# Altium PCB extension.PcbDoc (part 1 of 3)
Units mil, origin at the board's own origin, x right, y up, seen from the top; angles counter-clockwise.
Board outline 6141.73 x 4724.41 mil, 4 copper layers (Top Copper, Supply, GND, Bot Copper), stack 61.417 mil thick; 231 components, 147 nets, 660 pads, 234 vias.
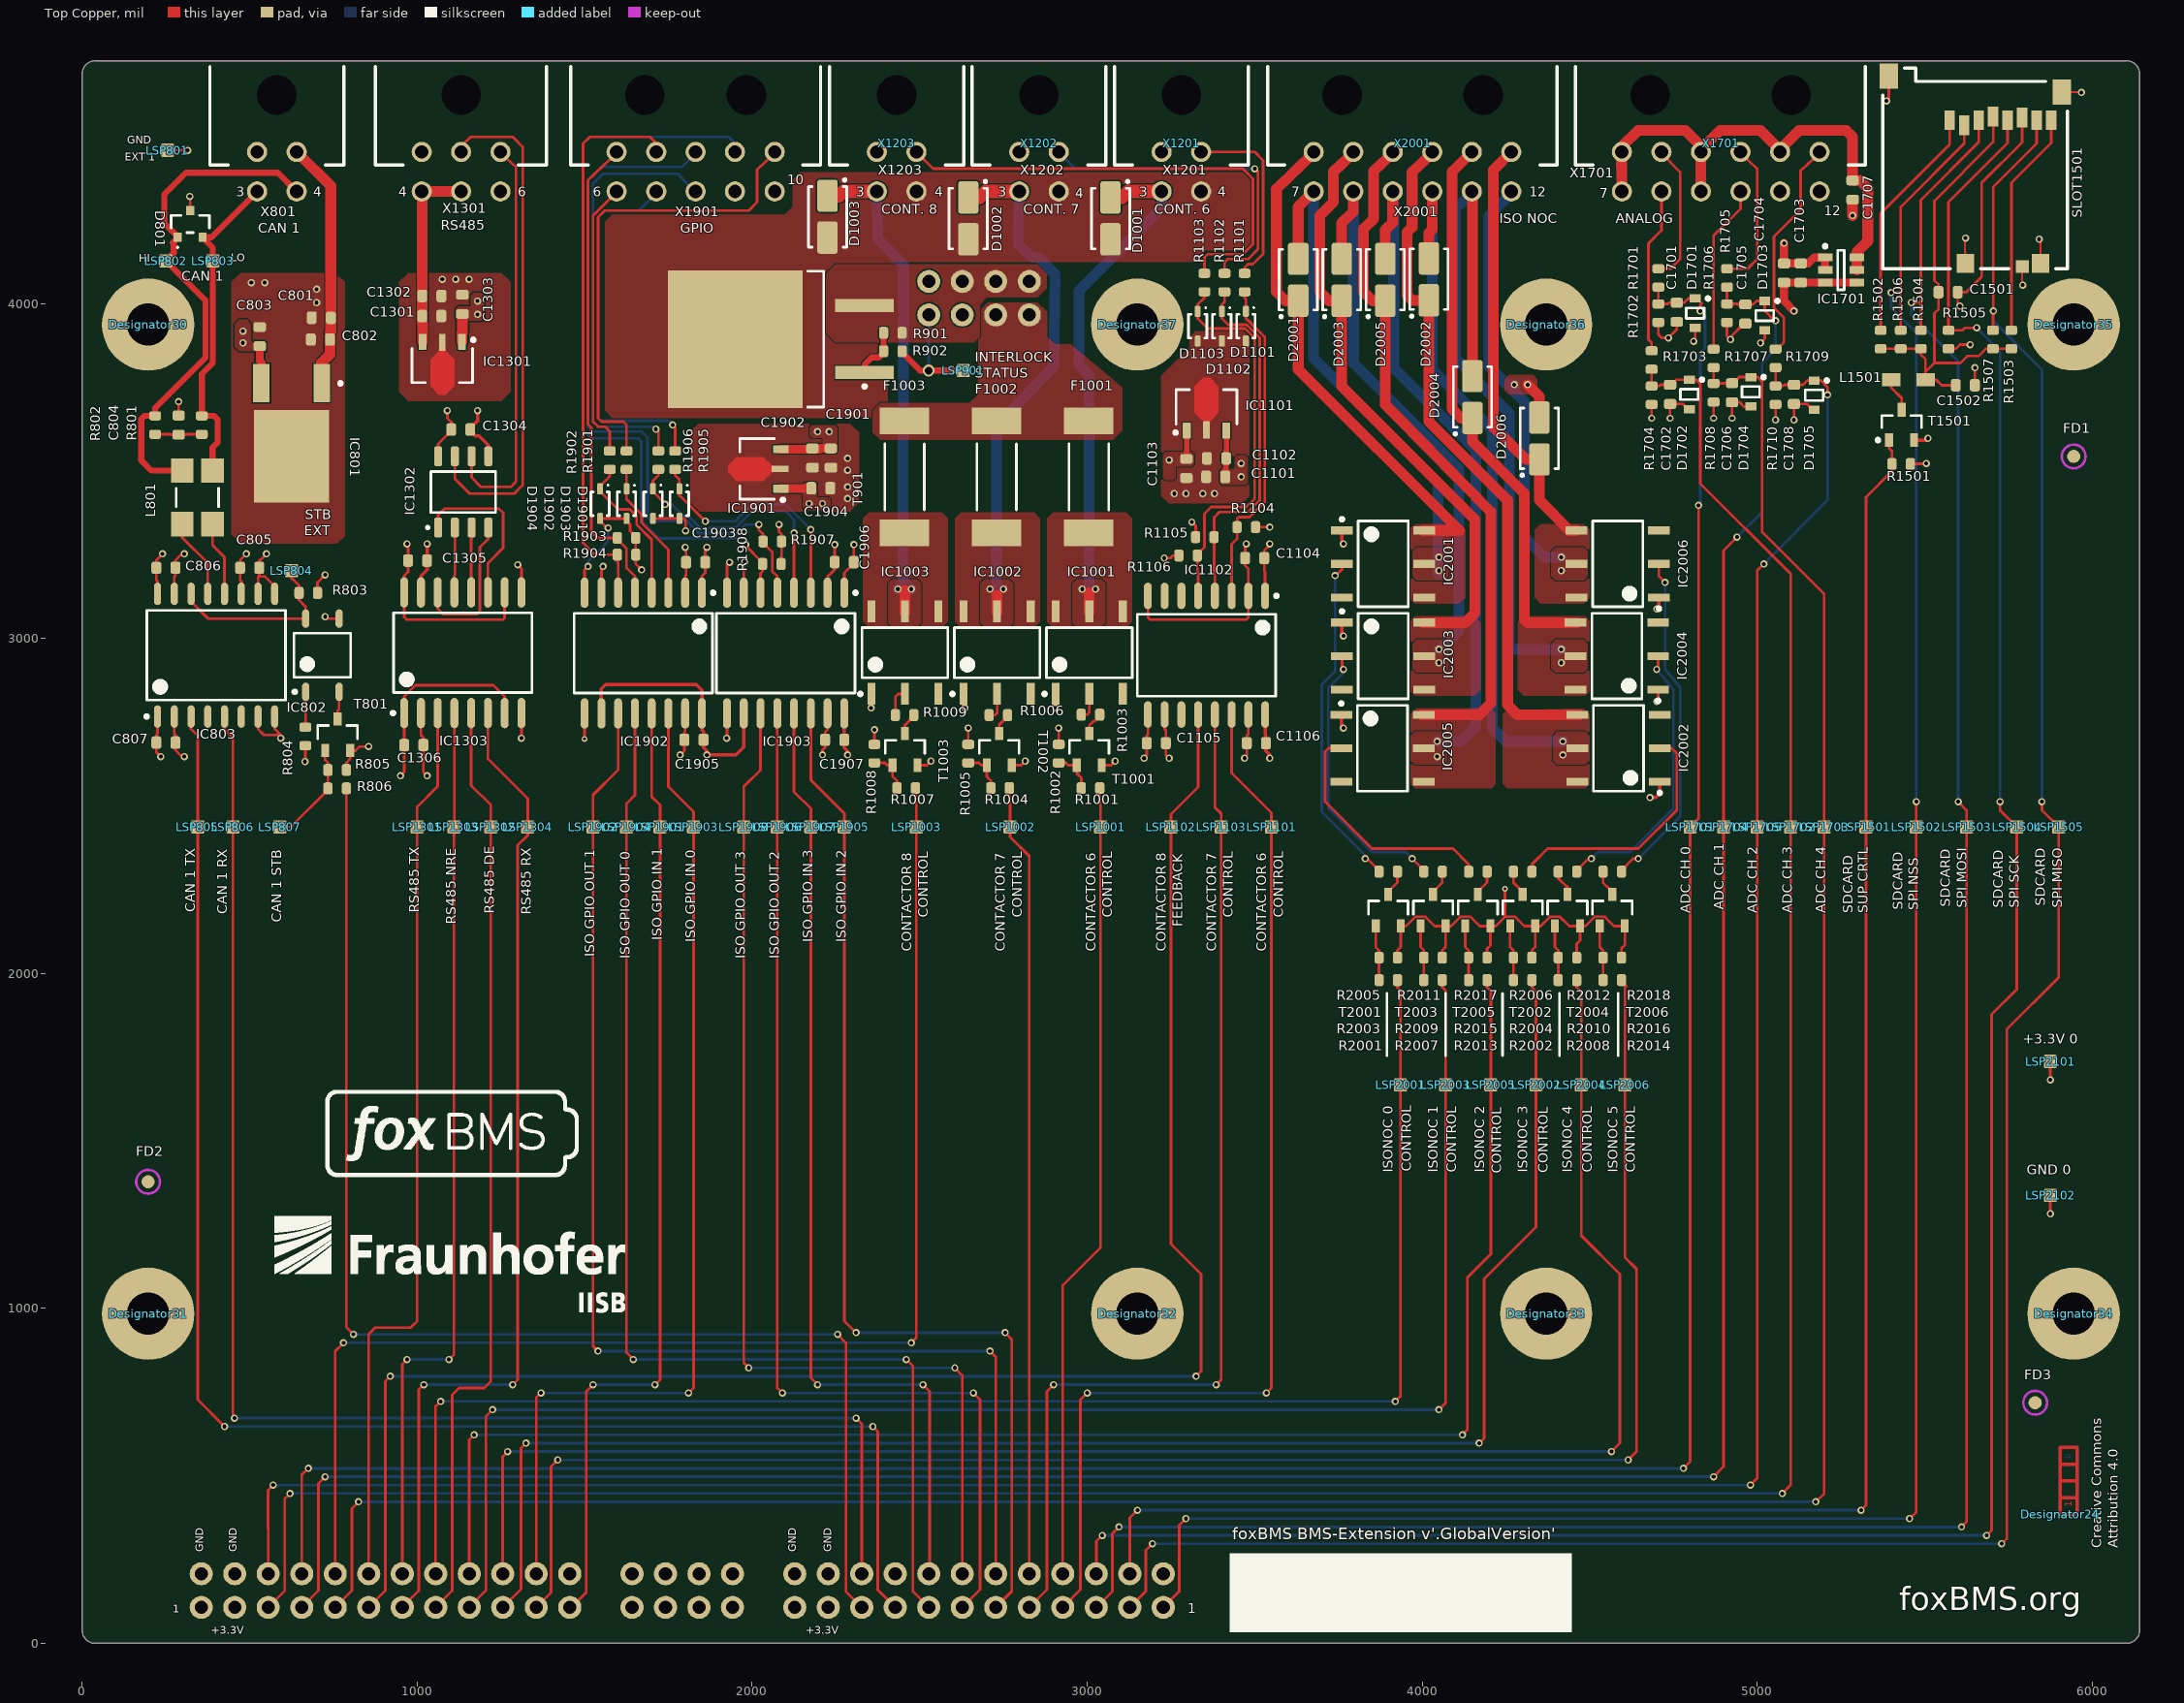
[diagram p0: Top Copper view]
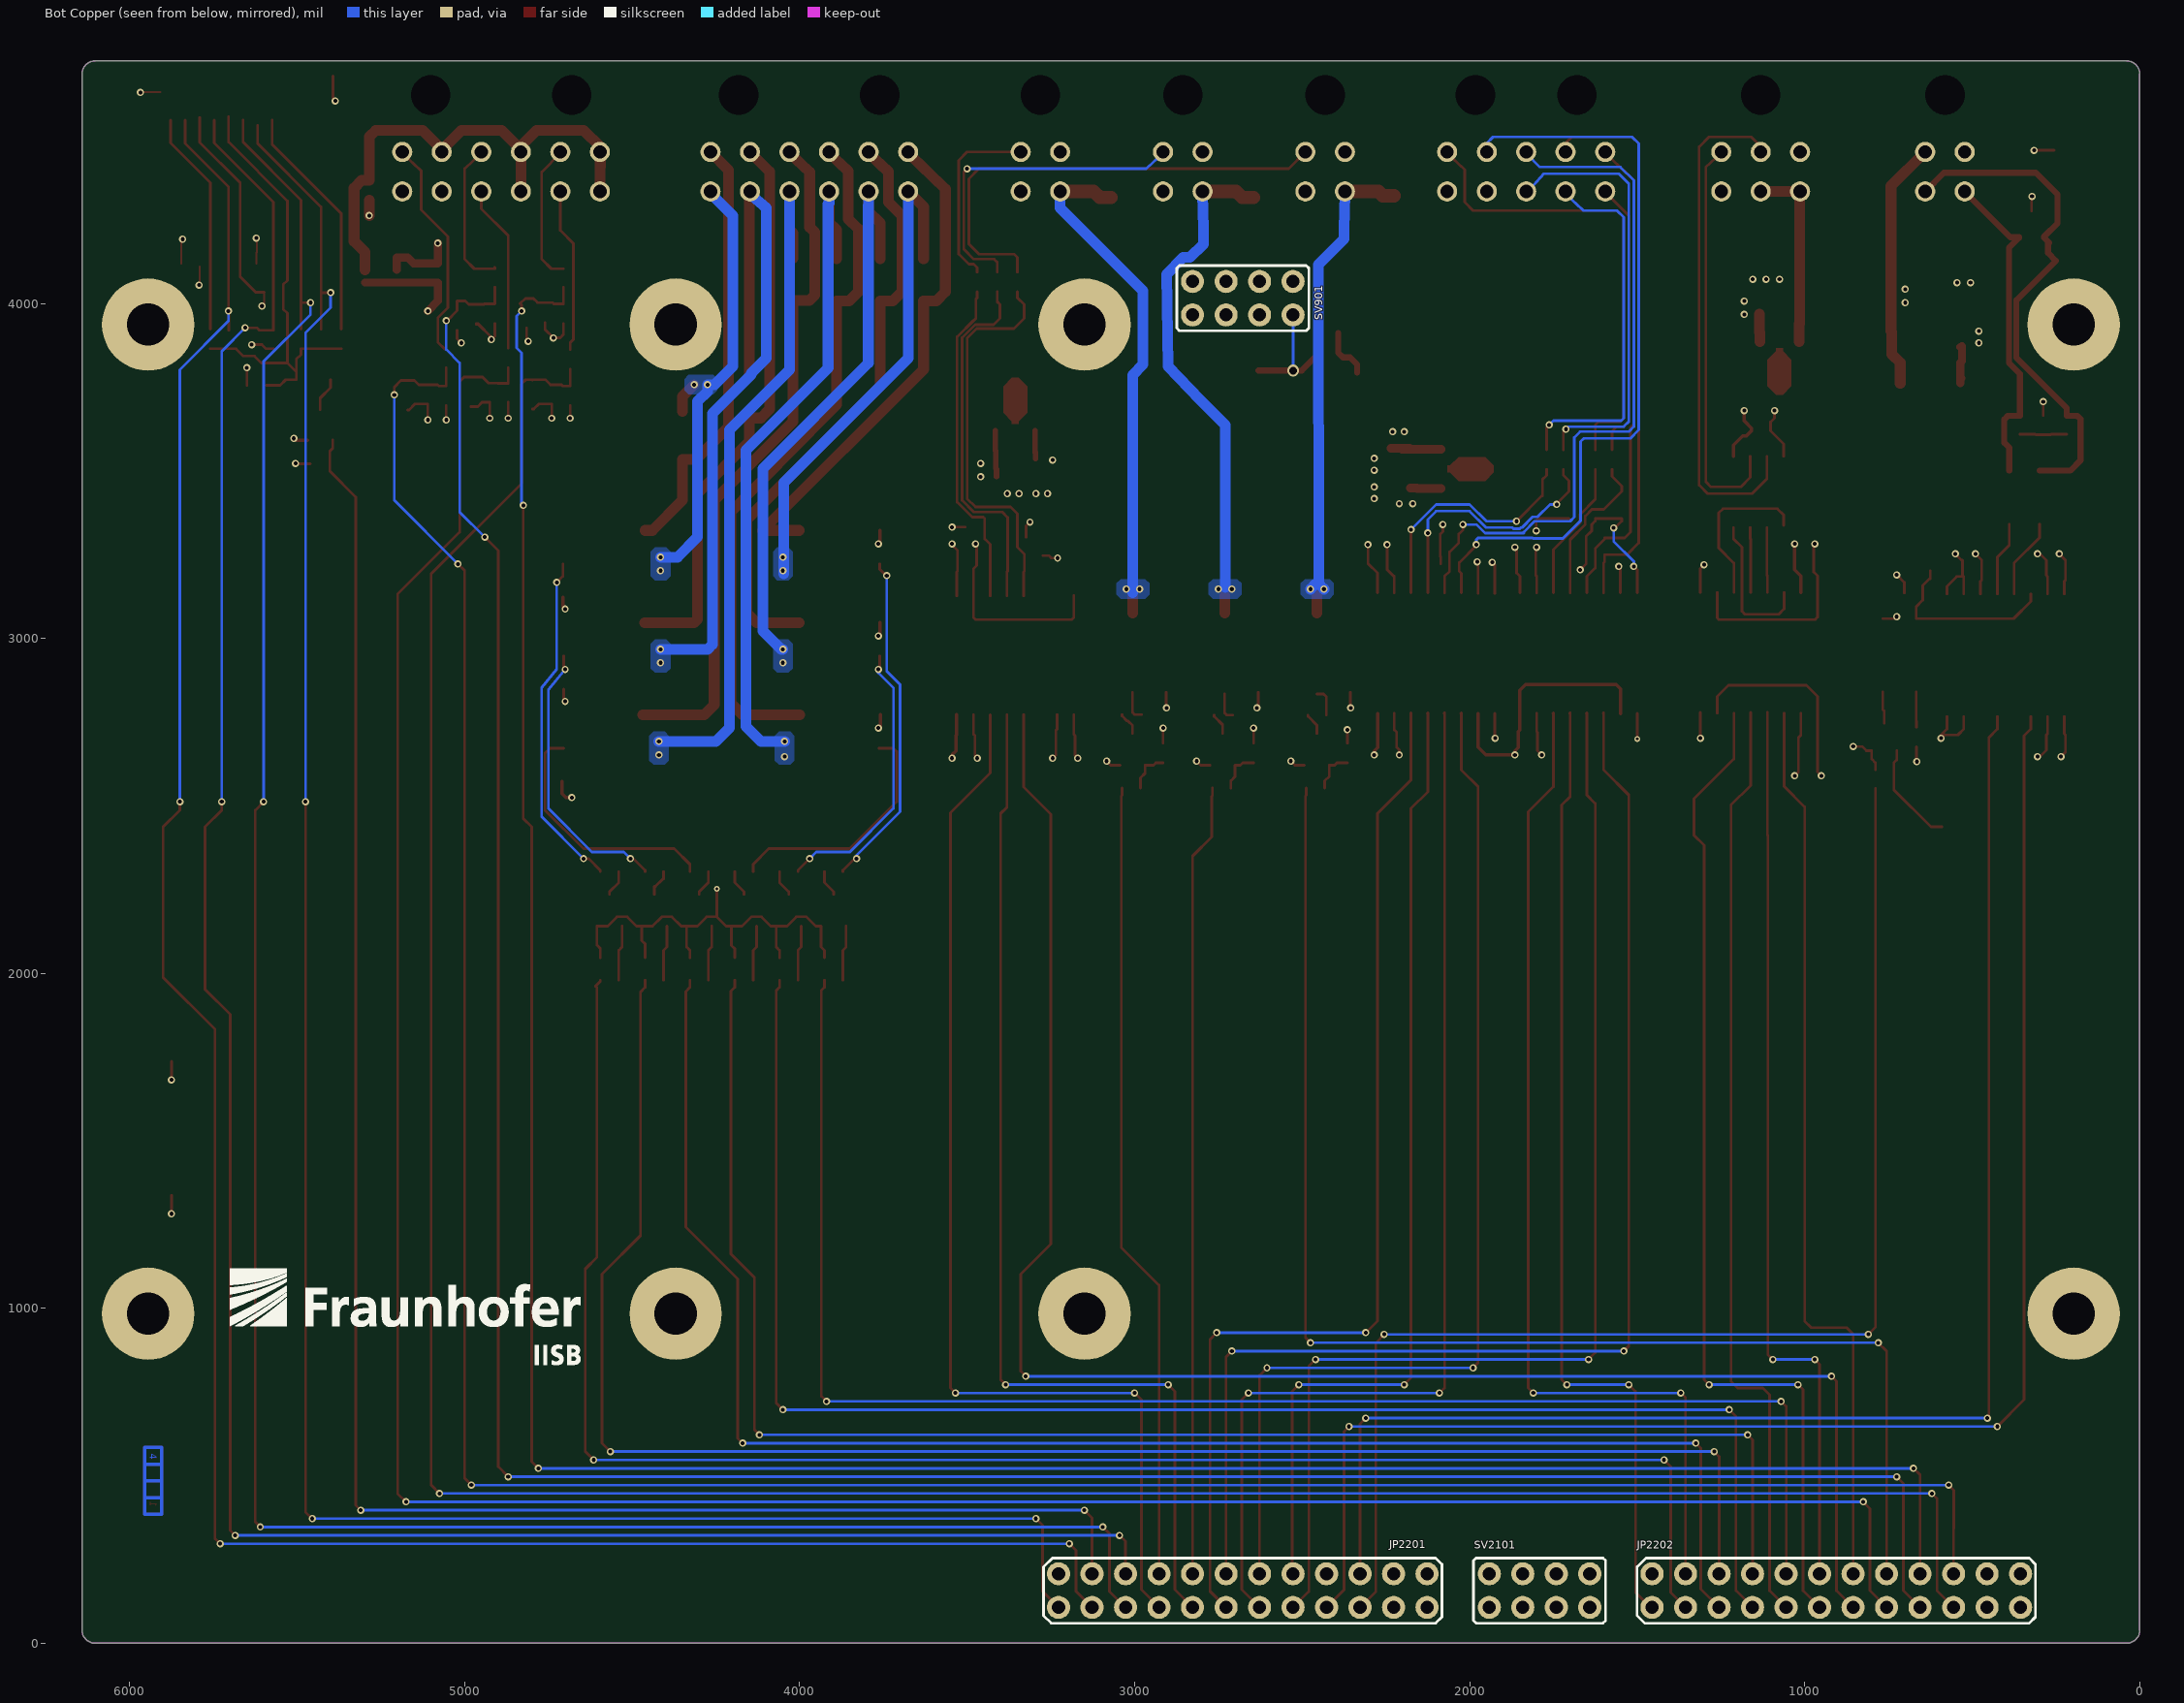
[diagram p1: Bot Copper view, seen from below]
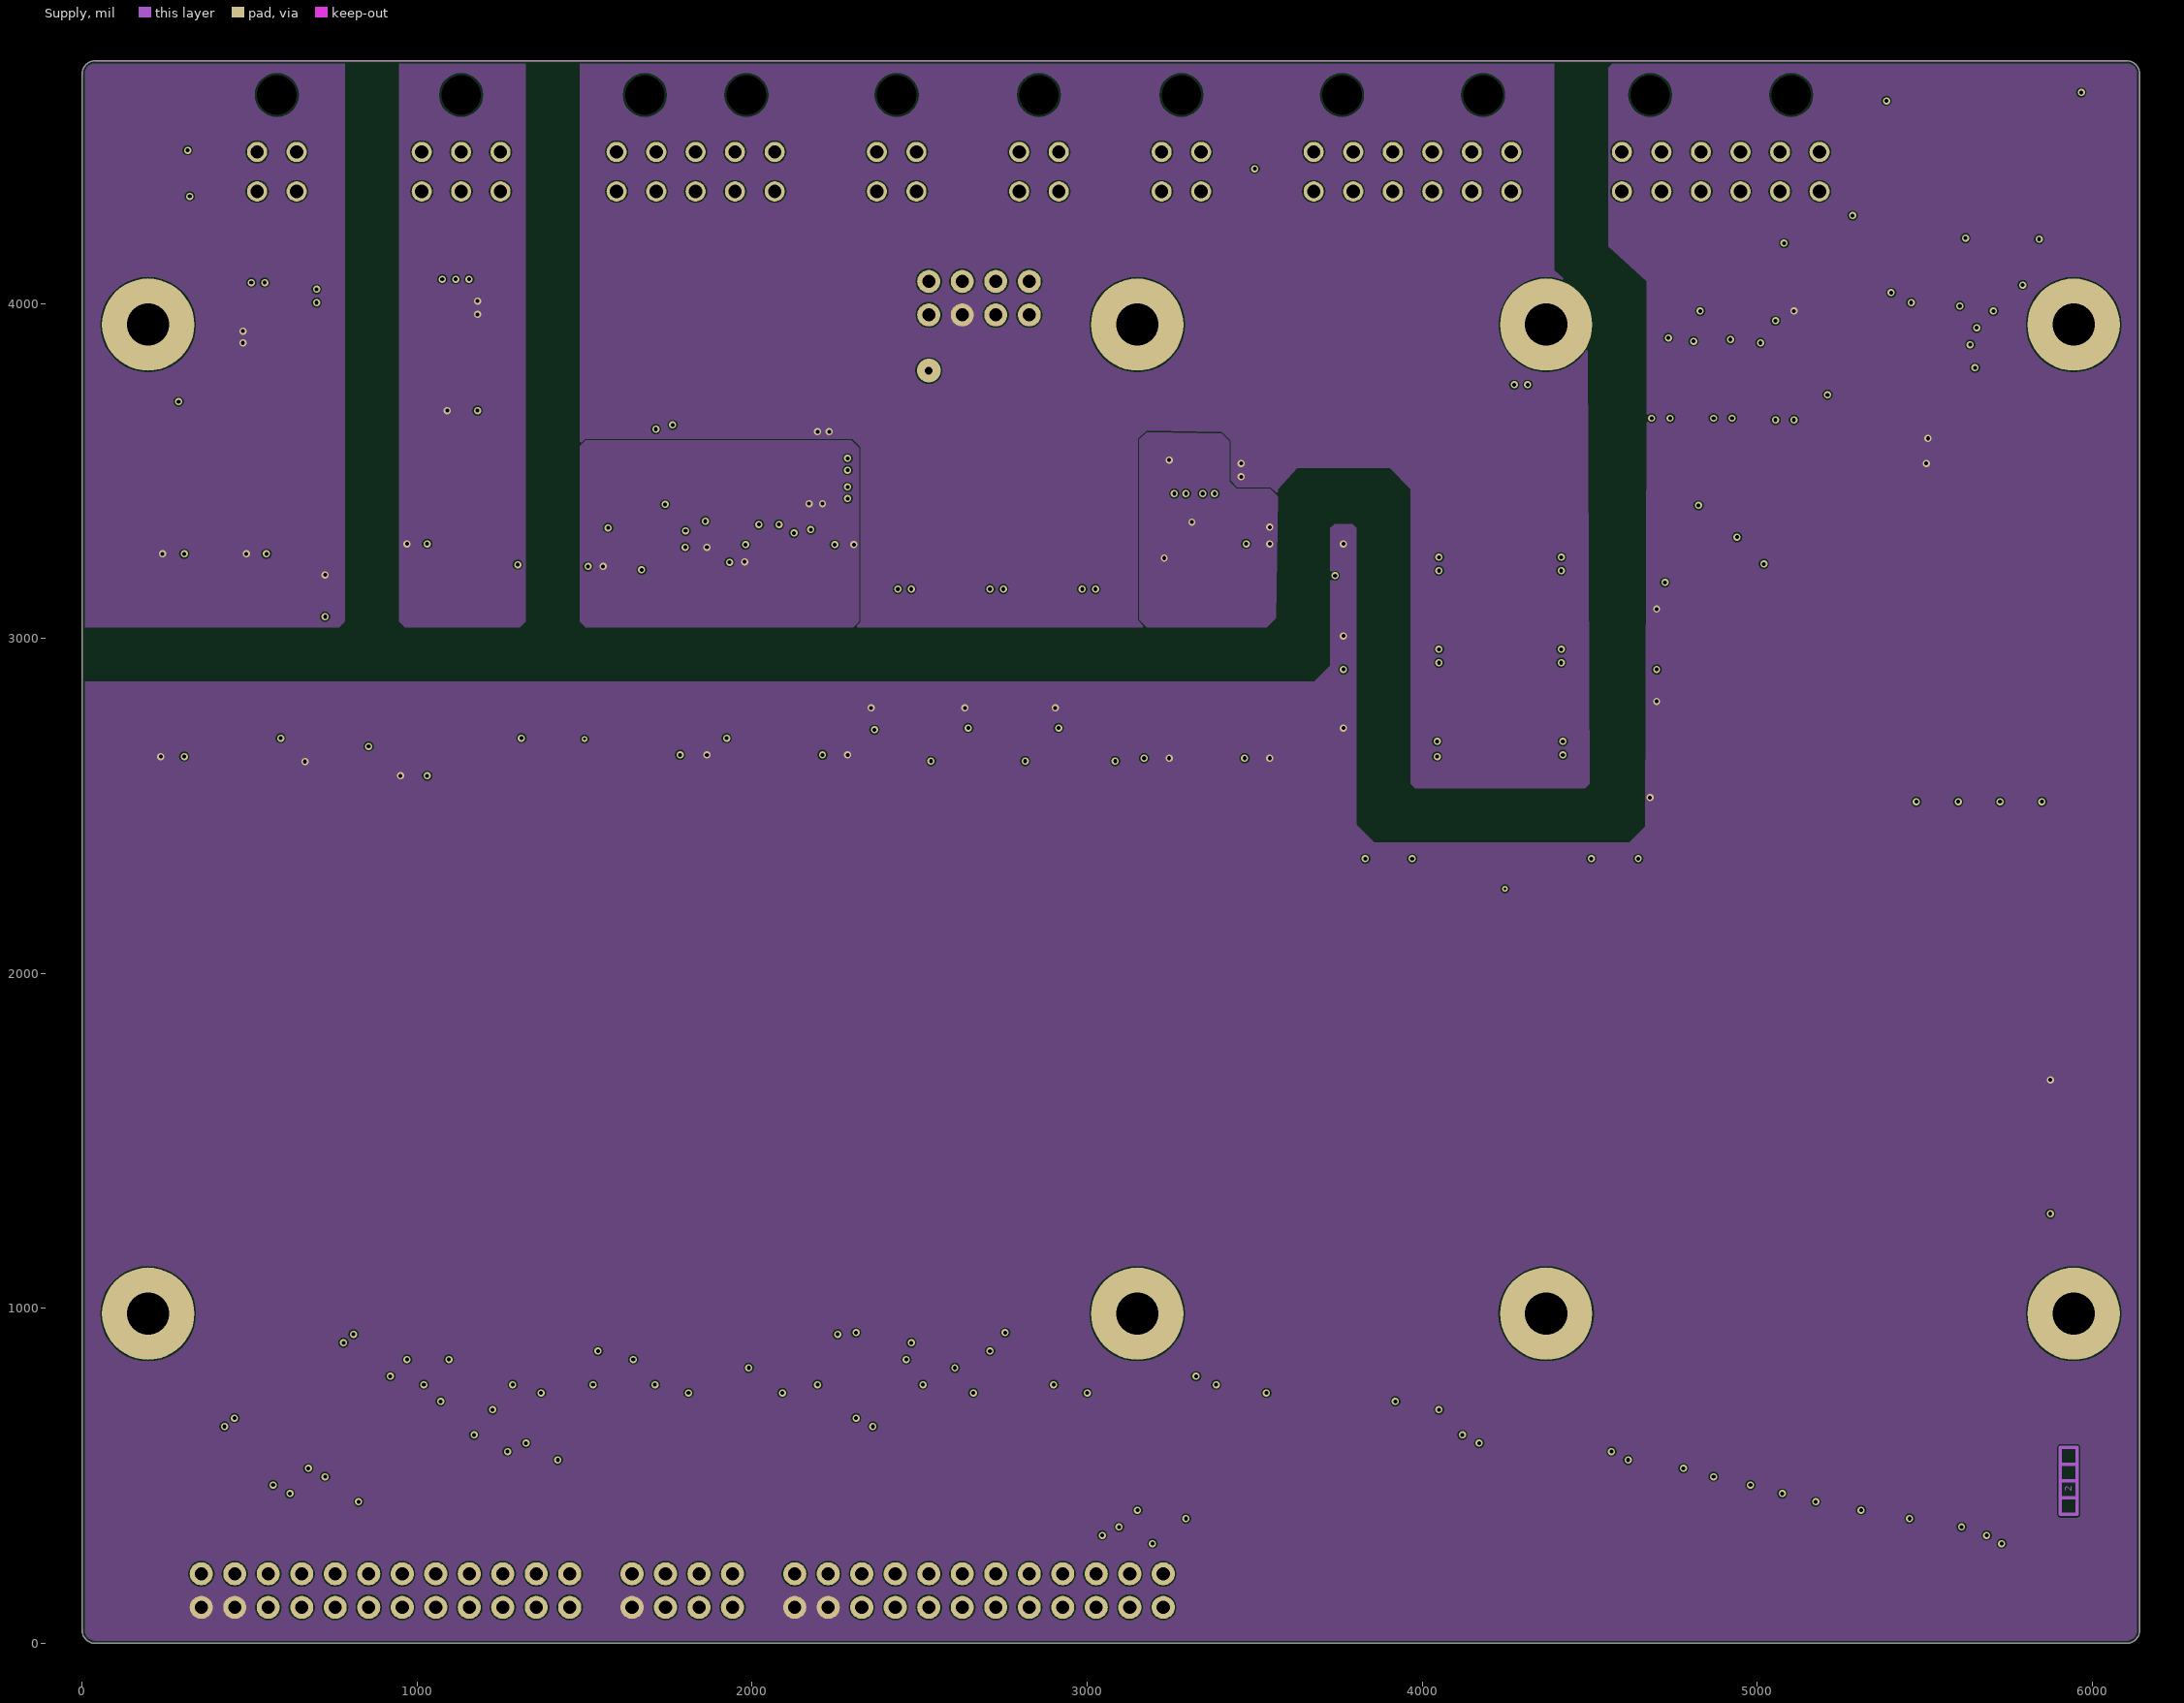
[diagram p2: Supply]
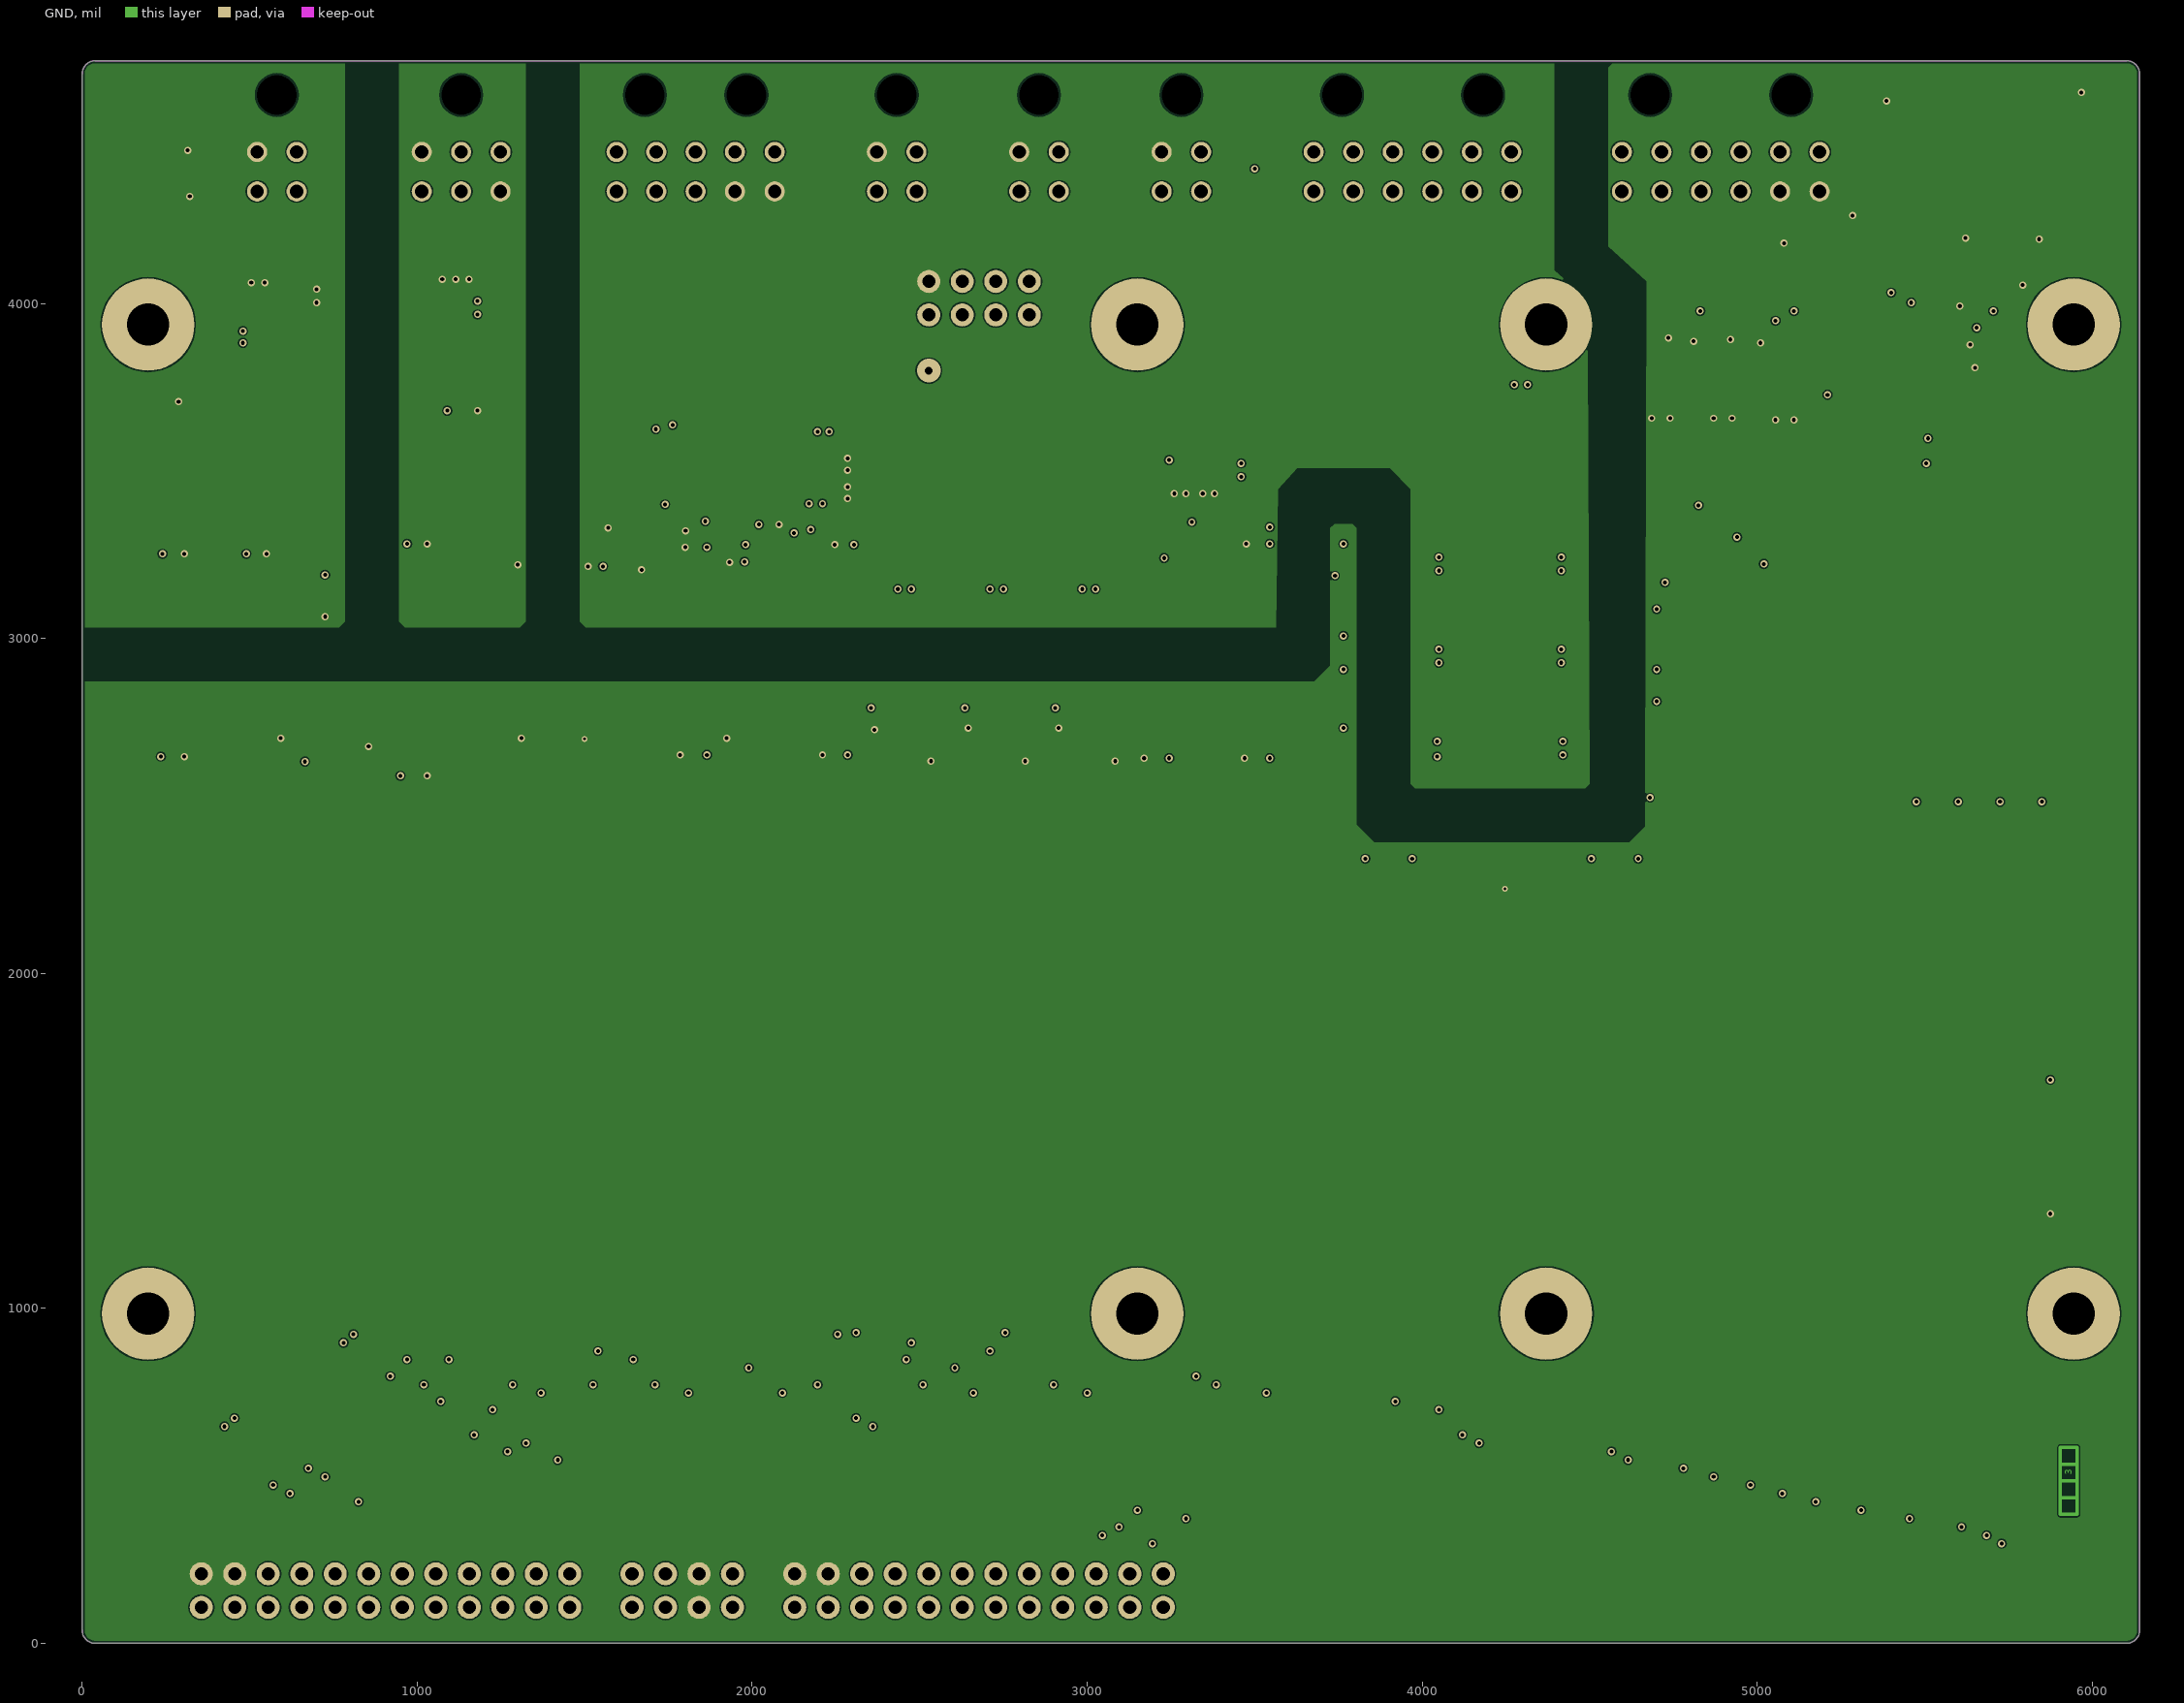
[diagram p3: GND]

## Layer stack, top to bottom
Top Solder: solder mask 0.591, Solder Resist, Dk 3.5
Top Copper: signal copper 1.378
Dielectric 1: prepreg 14.173, FR-4, Dk 4.6
Supply: signal copper 1.378
Dielectric 2: core 27.559, FR-4, Dk 4.6
GND: signal copper 1.378
Dielectric 3: prepreg 14.173, FR-4, Dk 4.6
Bot Copper: signal copper 1.378
Bottom Solder: solder mask 0.591, Solder Resist, Dk 3.5

## Board outline
0,39.37 0,4685.04 cw(c39.37,4685.04) 39.37,4724.41 6102.36,4724.41 cw(c6102.36,4685.04) 6141.73,4685.04 6141.73,39.37 cw(c6102.36,39.37) 6102.36,0 39.37,0 cw(c39.37,39.37)

## Design rules (kind name [scope] priority, off if disabled: settings)
AssemblyTestPointUsage [All] p1 off:
AssemblyTestpoint [(IsPad And (OnTopLayer Or OnBottomLayer)) Or (IsPad And OnMultiLayer)] p1 off: testpointundercomponent=FALSE minsize=40 maxsize=100 preferedsize=60 minholesize=0 maxholesize=40 preferedholesize=32 testpointgrid=1 usegrid=TRUE gridtolerance=0.01 allowsidetop=TRUE
BoardOutlineClearance [All] p1: gap=8 ignorepadtopadclearanceinfootprint=FALSE except(20: Arc-CavityEdge Track-CavityEdge SMDPad-CavityEdge THPad-CavityEdge Via-CavityEdge Fill-CavityEdge Poly-CavityEdge Region-CavityEdge Text-CavityEdge)
Clearance [All] p1: gap=4 ignorepadtopadclearanceinfootprint=TRUE except(6: Arc-Text Arc-Hole Track-Text Track-Hole SMDPad-Text SMDPad-Hole THPad-Text THPad-Hole Via-Text Via-Hole Fill-Text Fill-Hole Poly-Text Poly-Hole Region-Text Region-Hole Text-Text Text-Hole; 8: Arc-Via Track-Via SMDPad-Via THPad-Via Via-Via)
FabricationTestpoint [All] p1: side=1 testpointundercomponent=TRUE minsize=20 maxsize=300 preferedsize=60 minholesize=0 maxholesize=40 preferedholesize=32 testpointgrid=1 allowsidetop=TRUE usegrid=FALSE gridtolerance=0.01
HoleSize [All] p1: absolutevalues=TRUE maxlimit=236 minlimit=7.87 maxpercent=80.000 minpercent=20.000
HoleToHoleClearance [All] p1: gap=6 allowstackedmicrovias=TRUE
MinimumAnnularRing [All] p1: minimumring=4
MinimumSolderMaskSliver [All] p1: minsoldermaskwidth=4
PlaneConnect [All] p1: planeconnectstyle=Direct reliefexpansion=20 reliefentries=4 reliefconductorwidth=10 reliefairgap=10
PolygonConnect [All] p1: connectstyle=Direct reliefconductorwidth=10 reliefentries=4 polygonreliefangle="90 Angle" airgapwidth=10
RoutingVias [All] p1: holewidth=8 width=17.72 viastyle="Through Hole" minholewidth=8 minwidth=17.72 maxholewidth=39.37 maxwidth=275.59
SMDEntry [All] p1: side=TRUE corner=TRUE anyangle=FALSE
SMDToCorner [All] p1: distance=40000
SilkToSolderMaskClearance [IsPad] p1: minsilkscreentomaskgap=4 clearancetoexposedcopper=FALSE
SolderMaskExpansion SolderMaskExpansion_VIAs [IsVia] p1: expansion=-393.7 // Cover all Vias
SolderMaskExpansion [All] p2: expansion=2
UnRoutedNet [All] p1: checkbadconnections=TRUE
UnpouredPolygon UnpouredPolygon_1 [All] p1:
Width [All] p1: maxlimit=60 minlimit=4 preferedwidth=6
20 further rules are at their usual default settings.

## Classes and differential pairs
component class U_13_connectors_to_BMS_master: JP2201 JP2202
component class U_12_FPGA_SPI_interface: LSP2101 LSP2102 SV2101
component class U_11_isolated_NO_contacts: D2001 D2002 D2003 D2004 D2005 D2006 IC2001 IC2002 IC2003 IC2004 IC2005 IC2006 LSP2001 LSP2002 LSP2003 LSP2004 LSP2005 LSP2006 R2001 R2002 R2003 R2004 R2005 R2006 R2007 R2008 R2009 R2010 R2011 R2012 R2013 R2014 R2015 R2016 R2017 R2018 T2001 T2002 T2003 T2004 T2005 T2006 X2001
component class U_10_iso_GPIO_4in_4out: C1901 C1902 C1903 C1904 C1905 C1906 C1907 D1901 D1902 D1903 D1904 IC1901 IC1902 IC1903 LSP1901 LSP1902 LSP1903 LSP1904 LSP1905 LSP1906 LSP1907 LSP1908 R1901 R1902 R1903 R1904 R1905 R1906 R1907 R1908 X1901
component class U_09_analog_inputs_not_isolated: C1701 C1702 C1703 C1704 C1705 C1706 C1707 C1708 D1701 D1702 D1703 D1704 D1705 IC1701 LSP1701 LSP1702 LSP1703 LSP1704 LSP1705 R1701 R1702 R1703 R1704 R1705 R1706 R1707 R1708 R1709 R1710 X1701
component class U_08_memorycard: C1501 C1502 L1501 LSP1501 LSP1502 LSP1503 LSP1504 LSP1505 R1501 R1502 R1503 R1504 R1505 R1506 R1507 SLOT1501 T1501
component class U_07_isolated_rs485: C1301 C1302 C1303 C1304 C1305 C1306 IC1301 IC1302 IC1303 LSP1301 LSP1302 LSP1303 LSP1304 X1301
component class U_06_contactor_connectors: X1201 X1202 X1203
component class U_05_contactor_feedback: C1101 C1102 C1103 C1104 C1105 C1106 D1101 D1102 D1103 IC1101 IC1102 LSP1101 LSP1102 LSP1103 R1101 R1102 R1103 R1104 R1105 R1106
component class U_04_contactor_control: D1001 D1002 D1003 F1001 F1002 F1003 IC1001 IC1002 IC1003 LSP1001 LSP1002 LSP1003 R1001 R1002 R1003 R1004 R1005 R1006 R1007 R1008 R1009 T1001 T1002 T1003
component class U_03_interlock: LSP901 R901 R902 SV901 T901
component class U_02_CAN_1: C801 C802 C803 C804 C805 C806 C807 D801 IC801 IC802 IC803 L801 LSP801 LSP802 LSP803 LSP804 LSP805 LSP806 LSP807 R801 R802 R803 R804 R805 R806 T801 X801
polygon class PolygonThermal_OFF: Polygon_1_Net_+3.3V_0 Polygon_1_Net_CAN_TRANS_1_EXT_SUPPLY Polygon_1_Net_CONTACTOR_6_COIL_POS Polygon_1_Net_CONTACTOR_7_COIL_POS Polygon_1_Net_CONTACTOR_8_COIL_POS Polygon_1_Net_CONTACTOR_FEEDBACK_SUPPLY_EXT Polygon_1_Net_CONTACTORS_COMMON_NEG Polygon_1_Net_GND_0 Polygon_1_Net_GND_EXT_0 Polygon_1_Net_GND_EXT_1 Polygon_1_Net_GND_EXT_3 Polygon_1_Net_ISO_GPIO_SUPPLY Polygon_1_Net_ISONOC_0_NEGATIVE Polygon_1_Net_ISONOC_0_POSITIVE Polygon_1_Net_ISONOC_1_NEGATIVE Polygon_1_Net_ISONOC_1_POSITIVE Polygon_1_Net_ISONOC_2_NEGATIVE Polygon_1_Net_ISONOC_2_POSITIVE Polygon_1_Net_ISONOC_3_NEGATIVE Polygon_1_Net_ISONOC_3_POSITIVE Polygon_1_Net_ISONOC_4_NEGATIVE Polygon_1_Net_ISONOC_4_POSITIVE Polygon_1_Net_ISONOC_5_NEGATIVE Polygon_1_Net_ISONOC_5_POSITIVE Polygon_1_Net_N$18 Polygon_1_Net_N$19 Polygon_1_Net_N$21 Polygon_1_Net_N$279 Polygon_1_Net_SUPPLY_EXT_0 Polygon_1_Net_SUPPLY_EXT_2 Polygon_2_Net_CAN_TRANS_1_EXT_SUPPLY Polygon_2_Net_CONTACTOR_6_COIL_POS Polygon_2_Net_CONTACTOR_7_COIL_POS Polygon_2_Net_CONTACTOR_8_COIL_POS Polygon_2_Net_CONTACTOR_FEEDBACK_SUPPLY_EXT Polygon_2_Net_GND_EXT_0 Polygon_2_Net_GND_EXT_1 Polygon_2_Net_GND_EXT_3 Polygon_2_Net_ISO_GPIO_SUPPLY Polygon_2_Net_ISONOC_0_NEGATIVE Polygon_2_Net_ISONOC_1_NEGATIVE Polygon_2_Net_ISONOC_2_NEGATIVE Polygon_2_Net_ISONOC_3_NEGATIVE Polygon_2_Net_ISONOC_4_NEGATIVE Polygon_2_Net_ISONOC_5_NEGATIVE Polygon_2_Net_N$279 Polygon_2_Net_SUPPLY_EXT_0 Polygon_3_Net_GND_EXT_0 Polygon_3_Net_GND_EXT_2 Polygon_3_Net_ISONOC_0_NEGATIVE Polygon_3_Net_ISONOC_5_NEGATIVE Polygon_3_Net_N$279 Polygon_3_Net_SUPPLY_EXT_0 Polygon_4_Net_ISONOC_5_NEGATIVE
polygon class Isolate_8: Polygon_1_Net_CONTACTOR_6_COIL_POS Polygon_1_Net_CONTACTOR_7_COIL_POS Polygon_1_Net_CONTACTOR_8_COIL_POS Polygon_1_Net_CONTACTOR_FEEDBACK_SUPPLY_EXT Polygon_1_Net_CONTACTORS_COMMON_NEG Polygon_1_Net_ISO_GPIO_SUPPLY Polygon_1_Net_ISONOC_0_NEGATIVE Polygon_1_Net_ISONOC_0_POSITIVE Polygon_1_Net_ISONOC_1_NEGATIVE Polygon_1_Net_ISONOC_1_POSITIVE Polygon_1_Net_ISONOC_2_NEGATIVE Polygon_1_Net_ISONOC_2_POSITIVE Polygon_1_Net_ISONOC_3_NEGATIVE Polygon_1_Net_ISONOC_3_POSITIVE Polygon_1_Net_ISONOC_4_NEGATIVE Polygon_1_Net_ISONOC_4_POSITIVE Polygon_1_Net_ISONOC_5_NEGATIVE Polygon_1_Net_ISONOC_5_POSITIVE Polygon_1_Net_N$18 Polygon_1_Net_N$19 Polygon_1_Net_N$21 Polygon_1_Net_SUPPLY_EXT_0 Polygon_2_Net_CAN_TRANS_1_EXT_SUPPLY Polygon_2_Net_GND_EXT_0 Polygon_2_Net_GND_EXT_1 Polygon_2_Net_GND_EXT_3 Polygon_2_Net_N$279 Polygon_3_Net_GND_EXT_0 Polygon_3_Net_GND_EXT_2 Polygon_3_Net_N$279 Polygon_3_Net_SUPPLY_EXT_0
polygon class Isolate_10: Polygon_2_Net_SUPPLY_EXT_0
pad class SMDSolder_OFF: IC1101-2 IC1301-2 IC1901-2 T901-2
pad class SMDPaste_OFF: IC1101-2 IC1301-2 IC1901-2 T901-1 T901-2 T901-3

## Components (designator, comment, footprint, x,y, rotation, side; value= is the part's Value field where it differs from the comment)
C801 "1u/50V" CAPC1608X08N 713.74,3957.4 r0 top locked
C802 "100n/50V" CAPC1608X08N 711.26,3892.4 r0 top
C803 "100n/50V" CAPC1608X08N 530,3901.14 r270 top
C804 "4n7/50V" CAPC1608X08N 288,3637 r90 top
C805 "100n/50V" CAPC1608X08N 500,3210.99 r180 top
C806 "100n/50V" CAPC1608X08N 250,3210.99 r180 top
C807 "100n/50V" CAPC1608X08N 250,2689.01 r180 top
C1101 "100n/50V" CAPC1608X08N 3383.74,3482.4 r180 top
C1102 "1u/50V" CAPC1608X08N 3386.26,3537.4 r180 top
C1103 "100n/50V" CAPC1608X08N 3296.26,3507.4 r270 top
C1104 "100n/50V" CAPC1608X08N 3500,3240 r180 top
C1105 "100n/50V" CAPC1608X08N 3206.26,2687.4 r180 top
C1106 "100n/50V" CAPC1608X08N 3505,2687.4 r180 top
C1301 "1u/50V" CAPC1608X08N 1043.74,3962.4 r0 top
C1302 "100n/50V" CAPC1608X08N 1043.74,4022.4 r0 top
C1303 "100n/50V" CAPC1608X08N 1135,3997.4 r90 top
C1304 "100n/50V" CAPC1608X08N 1130,3623.59 r0 top
C1305 "100n/50V" CAPC1608X08N 1001.26,3232.4 r0 top
C1306 "100n/50V" CAPC1608X08N 990,2681.64 r0 top
C1501 "100n/50V" CAPC1608X08N 5570,4033.66 r180 top
C1502 "1u/50V" CAPC1608X08N 5621.46,3756 r0 top locked
C1701 "100n/50V" CAPC1608X08N 4760,3973.66 r270 top
C1702 "100n/50V" CAPC1608X08N 4740,3728.66 r270 top
C1703 "1u/50V" CAPC1608X08N 5130,4091.14 r90 top
C1704 "100n/50V" CAPC1608X08N 5080,4091.14 r90 top
C1705 "100n/50V" CAPC1608X08N 4965,3968.66 r270 top
C1706 "100n/50V" CAPC1608X08N 4925,3733.66 r270 top
C1707 "100n/50V" CAPC1608X08N 5285,4338.66 r270 top
C1708 "100n/50V" CAPC1608X08N 5110,3728.66 r270 top
C1901 "100n/50V" CAPC1608X08N 2235,3538.66 r270 top
C1902 "1u/50V" CAPC1608X08N 2180,3538.66 r270 top
C1903 "100n/50V" CAPC1608X08N 1831.26,3227.4 r180 top
C1904 "100n/50V" CAPC1608X08N 2205,3448.66 r0 top
C1905 "100n/50V" CAPC1608X08N 1826.26,2697.4 r180 top
C1906 "100n/50V" CAPC1608X08N 2275,3228 r180 top locked
C1907 "100n/50V" CAPC1608X08N 2246.26,2697.4 r180 top
D801 "PESD1CAN" NXP-SOT23-3_V 322.5,4237.4 r180 top
D1001 "d_si_sma_1A" DIOM4326X24N 3070,4253.66 r270 top locked
D1002 "d_si_sma_1A" DIOM4326X24N 2645,4253.66 r270 top locked
D1003 "d_si_sma_1A" DIOM4326X24N 2225,4258.66 r270 top locked
D1101 "CDSOD323-T05" SODFL250X110-2N 3473.82,3932.31 r270 top
D1102 "CDSOD323-T05" SODFL250X110-2N 3401.91,3932.31 r270 top
D1103 "CDSOD323-T05" SODFL250X110-2N 3330,3932 r270 top
D1701 "MM3Z3V3ST1G" ONSC-SOD-323-2-477-02_V 4815,3971.14 r270 top
D1702 "MM3Z3V3ST1G" ONSC-SOD-323-2-477-02_V 4797.5,3728.64 r270 top
D1703 "MM3Z3V3ST1G" ONSC-SOD-323-2-477-02_V 5022.5,3963.64 r270 top
D1704 "MM3Z3V3ST1G" ONSC-SOD-323-2-477-02_V 4981.25,3736.14 r270 top
D1705 "MM3Z3V3ST1G" ONSC-SOD-323-2-477-02_V 5170,3726.14 r270 top
D1901 "CDSOD323-T05" SODFL250X110-2N 1625,3402.31 r270 top
D1902 "CDSOD323-T05" SODFL250X110-2N 1546.09,3402.31 r270 top
D1903 "CDSOD323-T05" SODFL250X110-2N 1782.82,3402.31 r270 top
D1904 "CDSOD323-T05" SODFL250X110-2N 1703.91,3402.31 r270 top
D2001 "d_si_sma_1A" DIOM4326X24N 3630,4071.14 r90 top locked
D2002 "d_si_sma_1A" DIOM4326X24N 4020,4072.4 r90 top locked
D2003 "d_si_sma_1A" DIOM4326X24N 3760,4071.14 r90 top locked
D2004 "d_si_sma_1A" DIOM4326X24N 4150,3721.14 r90 top locked
D2005 "d_si_sma_1A" DIOM4326X24N 3890,4071.14 r90 top locked
D2006 "d_si_sma_1A" DIOM4326X24N 4350,3597.4 r90 top locked
Designator24 "Comment" layermarker4 5905,385 r90 top
Designator30 "Comment" Hole_3.2_Iso 196.85,3937.01 r0 top
Designator31 "Comment" Hole_3.2_Iso 196.85,984.25 r0 top
Designator32 "Comment" Hole_3.2_Iso 3149.61,984.25 r0 top
Designator33 "Comment" Hole_3.2_Iso 4370.08,984.25 r0 top
Designator34 "Comment" Hole_3.2_Iso 5944.88,984.25 r0 top
Designator35 "Comment" Hole_3.2_Iso 5944.88,3937.01 r0 top
Designator36 "Comment" Hole_3.2_Iso 4370.08,3937.01 r0 top
Designator37 "Comment" Hole_3.2_Iso 3149.61,3937.01 r0 top
F1001 "Schurter SMD Fuse 4.0A UMT 3403.0172.11" Schurter_UMT_250 3005,3482.4 r90 top locked
F1002 "Schurter SMD Fuse 4.0A UMT 3403.0172.11" Schurter_UMT_250 2730,3482.4 r90 top locked
F1003 "Schurter SMD Fuse 4.0A UMT 3403.0172.11" Schurter_UMT_250 2455,3482.4 r90 top locked
FD1 "Fiducial" Fiducial_2 5944.88,3543.31 r0 top locked
FD2 "Fiducial" Fiducial_2 196.85,1377.95 r0 top locked
FD3 "Fiducial" Fiducial_2 5829.88,718.31 r0 top locked (schematic designator FD1)
IC801 "KA7805ERT" DPAK228P950X240-3N 625,3612.4 r270 top
IC802 "CPC1008N" SOP254P610X218-4N 717.1,2949.9 r90 top
IC803 "TJA1052IT/5Y" NXP-SOIC-16_L 400,2950 r90 top
IC1001 "AQV252G2SX" SOP254P680X220-6N 3006.26,2957.4 r90 top
IC1002 "AQV252G2SX" SOP254P680X220-6N 2731.26,2957.4 r90 top
IC1003 "AQV252G2SX" SOP254P680X220-6N 2456.26,2957.4 r90 top
IC1101 "UA78L05CPK" PK0003A_L 3356.25,3687.4 r90 top
IC1102 "ADUM3300CRWZ" ADI-RW-16_L 3356.25,2949.9 r270 top locked
IC1301 "UA78L05CPK" PK0003A_L 1075,3818.65 r270 top locked
IC1302 "LT1785" SOIC127P600X175-8N 1137.5,3437.4 r90 top locked
IC1303 "ADUM3401CRWZ" ADI-RW-16_N 1136.25,2957.4 r90 top locked
IC1701 "ADR3425ARJZ-R2" ADI-RJ-6_N 5250.25,4100 r0 top locked
IC1901 "UA78L05CPK" PK0003A_L 2018.75,3506.15 r180 top locked
IC1902 "ADUM3402BRWZ" ADI-RW-16_N 1675,2956.15 r270 top
IC1903 "ADUM3402BRWZ" ADI-RW-16_N 2100,2956.15 r270 top
IC2001 "AQV252G2SX" SOP254P680X220-6N 3883.74,3222.4 r0 top
IC2002 "AQV252G2SX" SOP254P680X220-6N 4586.26,2672.4 r180 top
IC2003 "AQV252G2SX" SOP254P680X220-6N 3883.74,2947.4 r0 top
IC2004 "AQV252G2SX" SOP254P680X220-6N 4581.26,2947.4 r180 top
IC2005 "AQV252G2SX" SOP254P680X220-6N 3881.26,2672.4 r0 top
IC2006 "AQV252G2SX" SOP254P680X220-6N 4583.74,3222.4 r180 top
JP2201 "X2x12" Pinheader_2.54_2x12 2677.17,157.48 r180 bottom locked
JP2202 "X2x12" Pinheader_2.54_2x12 905.51,157.48 r180 bottom locked
L801 "51uH" B82789C0/S0 344,3421 r270 top
L1501 "BLM21AG471SN1J" MURA-BLM21-H1-CHIP-2_V 5451.26,3772.4 r180 top
LSP801 "Testpoint_Square" Testpoint_S1 255,4457.4 r90 top
LSP802 "Testpoint_Square" Testpoint_S1 250,4127.4 r0 top
LSP803 "Testpoint_Square" Testpoint_S1 390,4127.4 r0 top
LSP804 "Testpoint_Square" Testpoint_S1 625,3202.17 r90 top
LSP805 "Testpoint_Square" Testpoint_S1 345,2437.4 r90 top locked
LSP806 "Testpoint_Square" Testpoint_S1 450,2437.4 r90 top locked
LSP807 "Testpoint_Square" Testpoint_S1 590,2437.4 r90 top
LSP901 "Testpoint_Square" Testpoint_S1 2630,3800 r0 top
LSP1001 "Testpoint_Square" Testpoint_S1 3040,2437.4 r270 top
LSP1002 "Testpoint_Square" Testpoint_S1 2770,2437.4 r270 top
LSP1003 "Testpoint_Square" Testpoint_S1 2490,2437.4 r270 top
LSP1101 "Testpoint_Square" Testpoint_S1 3550,2437.4 r90 top
LSP1102 "Testpoint_Square" Testpoint_S1 3250,2437.4 r90 top
LSP1103 "Testpoint_Square" Testpoint_S1 3400,2437.4 r90 top
LSP1301 "Testpoint_Square" Testpoint_S1 1000,2437.4 r90 top locked
LSP1302 "Testpoint_Square" Testpoint_S1 1220,2437.4 r90 top locked
LSP1303 "Testpoint_Square" Testpoint_S1 1110,2437.4 r90 top locked
LSP1304 "Testpoint_Square" Testpoint_S1 1330,2437.4 r90 top locked
LSP1501 "Testpoint_Square" Testpoint_S1 5325,2437.4 r270 top
LSP1502 "Testpoint_Square" Testpoint_S1 5475,2437.4 r270 top
LSP1503 "Testpoint_Square" Testpoint_S1 5625,2437.4 r270 top
LSP1504 "Testpoint_Square" Testpoint_S1 5775,2437.4 r270 top
LSP1505 "Testpoint_Square" Testpoint_S1 5900,2437.4 r270 top
LSP1701 "Testpoint_Square" Testpoint_S1 4800,2437.4 r90 top
LSP1702 "Testpoint_Square" Testpoint_S1 5100,2437.4 r90 top
LSP1703 "Testpoint_Square" Testpoint_S1 5200,2437.4 r90 top
LSP1704 "Testpoint_Square" Testpoint_S1 4900,2437.4 r90 top
LSP1705 "Testpoint_Square" Testpoint_S1 5000,2437.4 r90 top
LSP1901 "Testpoint_Square" Testpoint_S1 1725,2437.4 r270 top locked
LSP1902 "Testpoint_Square" Testpoint_S1 1525,2437.4 r270 top locked
LSP1903 "Testpoint_Square" Testpoint_S1 1825,2437.4 r270 top locked
LSP1904 "Testpoint_Square" Testpoint_S1 1625,2437.4 r270 top locked
LSP1905 "Testpoint_Square" Testpoint_S1 2275,2437.4 r270 top locked
LSP1906 "Testpoint_Square" Testpoint_S1 2075,2437.4 r270 top locked
LSP1907 "Testpoint_Square" Testpoint_S1 2175,2437.4 r270 top locked
LSP1908 "Testpoint_Square" Testpoint_S1 1975,2437.4 r270 top locked
LSP2001 "Testpoint_Square" Testpoint_S1 3935,1667.4 r90 top
LSP2002 "Testpoint_Square" Testpoint_S1 4340,1667.4 r90 top
LSP2003 "Testpoint_Square" Testpoint_S1 4070,1667.4 r90 top
LSP2004 "Testpoint_Square" Testpoint_S1 4475,1667.4 r90 top
LSP2005 "Testpoint_Square" Testpoint_S1 4205,1667.4 r90 top
LSP2006 "Testpoint_Square" Testpoint_S1 4605,1667.4 r90 top
LSP2101 "Testpoint_Square" Testpoint_S1 5875,1737.4 r0 top
LSP2102 "Testpoint_Square" Testpoint_S1 5875,1337.4 r0 top
R801 "62R" RESC1608X05N 357.07,3637 r270 top
R802 "62R" RESC1608X05N 218,3637 r90 top
R803 "10k" RESC1608X05N 675,3136.09 r180 top locked
R804 "430R" RESC1608X05N 666.26,2707.4 r90 top locked
R805 "10k" RESC1608X05N 761.26,2607.4 r0 top
R806 "10R" RESC1608X05N 761.26,2552.4 r0 top locked
R901 "10k" RESC1608X05N 2420,3912.4 r0 top
R902 "10R" RESC1608X05N 2420,3857.4 r0 top locked
R1001 "10R" RESC1608X05N 3010,2553.33 r0 top locked
R1002 "10k" RESC1608X05N 2915,2656.14 r270 top
R1003 "430R" RESC1608X05N 3010,2772.4 r180 top locked
R1004 "10R" RESC1608X05N 2740,2553.33 r0 top locked
R1005 "10k" RESC1608X05N 2645,2656.14 r270 top
R1006 "430R" RESC1608X05N 2735,2771.14 r180 top locked
R1007 "10R" RESC1608X05N 2460,2553.33 r0 top locked
R1008 "10k" RESC1608X05N 2365,2656.14 r270 top
R1009 "430R" RESC1608X05N 2455,2771.14 r180 top locked
R1101 "47R" RESC1608X05N 3470,4062.4 r90 top locked
R1102 "47R" RESC1608X05N 3410,4062.4 r90 top locked
R1103 "47R" RESC1608X05N 3350,4062.4 r90 top locked
R1104 "10k" RESC1608X05N 3475,3332.4 r0 top
R1105 "10k" RESC1608X05N 3351.26,3302.4 r180 top
R1106 "10k" RESC1608X05N 3301.26,3247.4 r180 top
R1501 "47k" RESC1608X05N 5430,3521.14 r0 top
R1502 "10k" RESC1608X05N 5368.74,3892.4 r270 top
R1503 "10k" RESC1608X05N 5758.74,3892.4 r270 top
R1504 "10k" RESC1608X05N 5488.74,3892.4 r270 top
R1505 "10k" RESC1608X05N 5571.26,3892.4 r90 top
R1506 "10k" RESC1608X05N 5428.74,3892.4 r270 top
R1507 "10k" RESC1608X05N 5703.74,3892.4 r270 top
R1701 "0R" RESC1608X05N 4705,4076.14 r270 top locked
R1702 "4k75" RESC1608X05N 4705,3971.14 r270 top locked
R1703 "0R" RESC1608X05N 4685,3831.14 r270 top locked
R1704 "4k75" RESC1608X05N 4685,3726.14 r270 top locked
R1705 "0R" RESC1608X05N 4910,4076.14 r270 top locked
R1706 "4k75" RESC1608X05N 4910,3971.14 r270 top locked
R1707 "0R" RESC1608X05N 4870,3836.14 r270 top locked
R1708 "4k75" RESC1608X05N 4870,3733.66 r270 top locked
R1709 "0R" RESC1608X05N 5055,3836.14 r270 top locked
R1710 "4k75" RESC1608X05N 5055,3726.14 r270 top locked
R1901 "47R" RESC1608X05N 1625,3532.4 r90 top locked
R1902 "47R" RESC1608X05N 1575,3532.4 r90 top locked
R1903 "10k" RESC1608X05N 1625,3300 r180 top locked
R1904 "10k" RESC1608X05N 1625,3250 r180 top locked
R1905 "47R" RESC1608X05N 1770,3532.4 r90 top locked
R1906 "47R" RESC1608X05N 1720,3532.4 r90 top locked
R1907 "10k" RESC1608X05N 2060,3289.5 r180 top locked
R1908 "10k" RESC1608X05N 2058.74,3222.4 r180 top locked
R2001 "10R" RESC1608X05N 3898.74,1980 r0 top locked
R2002 "10R" RESC1608X05N 4299.99,1980 r0 top locked
R2003 "10k" RESC1608X05N 3898.74,2047.1 r180 top
R2004 "10k" RESC1608X05N 4299.99,2047.1 r180 top
R2005 "430R" RESC1608X05N 3898.74,2303.97 r180 top locked
R2006 "430R" RESC1608X05N 4299.99,2303.97 r0 top locked
R2007 "10R" RESC1608X05N 4032.49,1980 r0 top locked
R2008 "10R" RESC1608X05N 4433.74,1980 r0 top locked
R2009 "10k" RESC1608X05N 4032.49,2047.1 r180 top
R2010 "10k" RESC1608X05N 4433.74,2047.1 r180 top
R2011 "430R" RESC1608X05N 4032.49,2303.97 r180 top locked
R2012 "430R" RESC1608X05N 4433.74,2303.97 r0 top locked
R2013 "10R" RESC1608X05N 4166.24,1980 r0 top locked
R2014 "10R" RESC1608X05N 4567.49,1980 r0 top locked
R2015 "10k" RESC1608X05N 4166.24,2047.1 r180 top
R2016 "10k" RESC1608X05N 4567.49,2047.1 r180 top
R2017 "430R" RESC1608X05N 4166.24,2303.97 r180 top locked
R2018 "430R" RESC1608X05N 4567.49,2303.97 r0 top locked
SLOT1501 "molex_47352-1001" MOLEX_47352_1001 5871.47,4147.17 r180 top locked
SV901 "samtec_TLW-104-06-G-D" Pinheader_2.54_2x4 2677.17,4015.75 r180 bottom
SV2101 "samtec_TLW-104-06-G-D" Pinheader_2.54_2x4 1791.34,157.48 r180 bottom locked
T801 "IRLML0100TRPBF" SOT95P237X110-3N 762.5,2712.4 r90 top locked
T901 "BUK964R8-60E,118" NXP-SOT404_M 2087.5,3893.65 r180 top locked
T1001 "IRLML0100TRPBF" SOT95P237X110-3N 3006.25,2668.65 r90 top locked
T1002 "IRLML0100TRPBF" SOT95P237X110-3N 2737.5,2668.65 r90 top locked
T1003 "IRLML0100TRPBF" SOT95P237X110-3N 2456.25,2668.65 r90 top locked
T1501 "BSS84P" INF-PG-SOT23_N 5431.26,3637.4 r90 top locked
T2001 "IRLML0100TRPBF" SOT95P237X110-3N 3898.74,2188.65 r90 top locked
T2002 "IRLML0100TRPBF" SOT95P237X110-3N 4299.99,2188.65 r90 top locked
T2003 "IRLML0100TRPBF" SOT95P237X110-3N 4032.49,2188.65 r90 top locked
T2004 "IRLML0100TRPBF" SOT95P237X110-3N 4433.74,2188.65 r90 top locked
T2005 "IRLML0100TRPBF" SOT95P237X110-3N 4166.24,2188.65 r90 top locked
T2006 "IRLML0100TRPBF" SOT95P237X110-3N 4567.49,2188.65 r90 top locked
X801 "molex_microfit_3_02x2_THT" MOLEX_MICROFIT_02x2_THT 581.26,4622.4 r0 top locked
X1201 "molex_microfit_3_02x2_THT" MOLEX_MICROFIT_02x2_THT 3281.26,4622.4 r0 top locked
X1202 "molex_microfit_3_02x2_THT" MOLEX_MICROFIT_02x2_THT 2856.26,4622.4 r0 top locked
X1203 "molex_microfit_3_02x2_THT" MOLEX_MICROFIT_02x2_THT 2431.26,4622.4 r0 top locked
X1301 "molex_microfit_3_03x2_THT" MOLEX_MICROFIT_03x2_THT 1131.26,4622.4 r0 top locked
X1701 "molex_microfit_3_06x2_THT" MOLEX_MICROFIT_06x2_THT 4891.26,4622.4 r0 top locked
X1901 "molex_microfit_3_05x2_THT" MOLEX_MICROFIT_05x2_THT 1831.26,4622.4 r0 top locked
X2001 "molex_microfit_3_06x2_THT" MOLEX_MICROFIT_06x2_THT 3971.26,4622.4 r0 top locked

## Footprints (in the part's own frame and the unit in brackets; to place one, negate y for a bottom-side part, rotate by r counter-clockwise, add the part's x,y. Pads: shape width x height; smd on the part's side, far side on the other; paste and mask are expansions set on the pad)
ADI-RJ-6_N [mm] "SOT23, 6-Leads, Body 2.9x1.6mm, Pitch 0.95mm, IPC Medium Density"
  rect 1.1x0.6 smd: 1(-1.2,0.95) 2(-1.2,0) 3(-1.2,-0.95) 4(1.2,-0.95) 5(1.2,0) 6(1.2,0.95)
  silkscreen extent -1.32,-1.5 0.25,1.92, body extent -0.85,-1.5 0.85,1.5, height 1.45
ADI-RW-16_L [mm] "SOIC, 16-Leads, Body 10.3x7.5mm, Pitch 1.27mm, IPC High Density"
  oval 2x0.6 smd: 1(-4.5,4.445) 2(-4.5,3.175) 3(-4.5,1.905) 4(-4.5,0.635) 5(-4.5,-0.635) 6(-4.5,-1.905) 7(-4.5,-3.175) 8(-4.5,-4.445) 9(4.5,-4.445) 10(4.5,-3.175) 11(4.5,-1.905) 12(4.5,-0.635) 13(4.5,0.635) 14(4.5,1.905) 15(4.5,3.175) 16(4.5,4.445)
  silkscreen extent -4.62,-5.25 3.1,5.42, body extent -3.8,-5.25 3.8,5.25, height 2.65
ADI-RW-16_N [mm] "SOIC, 16-Leads, Body 10.3x7.5mm, Pitch 1.27mm, IPC Medium Density"
  oval 2.3x0.6 smd: 1(-4.575,4.445) 2(-4.575,3.175) 3(-4.575,1.905) 4(-4.575,0.635) 5(-4.575,-0.635) 6(-4.575,-1.905) 7(-4.575,-3.175) 8(-4.575,-4.445) 9(4.575,-4.445) 10(4.575,-3.175) 11(4.575,-1.905) 12(4.575,-0.635) 13(4.575,0.635) 14(4.575,1.905) 15(4.575,3.175) 16(4.575,4.445)
  silkscreen extent -4.7,-5.25 3.03,5.42, body extent -3.8,-5.25 3.8,5.25, height 2.65
B82789C0/S0 [mm] "SIMDAD 1812, common-mode chokes"
  rect 1.85x1.7 smd: 1(-2.025,1.15) 2(2.025,1.15) 3(2.025,-1.15) 4(-2.025,-1.15)
  silkscreen extent -0.7,-1.6 0.7,1.6, body extent -2.6,-1.6 2.6,1.6, height 3
CAPC1608X08N [mm] "Chip Capacitor, 2-Leads, Body 1,60x0,80mm, IPC Medium Density"
  rrect50% 0.75x0.95 smd: 1(-0.725,0) 2(0.725,0)
  body extent -0.85,-0.45 0.85,0.45, height 0.8
DIOM4326X24N [mm] "Molded Diode, 2-Leads, Body 4,30x2,60mm, IPC Medium Density, SMA, DO-214AC"
  rrect25% 2.45x1.55 smd: 1(-1.6,0) 2(1.575,0)
  silkscreen extent -2.9,-1.45 2.3,1.45, body extent -2.52,-1.45 2.52,1.45, height 2.4
DPAK228P950X240-3N [mm] "D-PAK, 3-Pads, Body 6,25x6,76mm (max), IPC Medium Density"
  rect 2.9x1.25 smd: 1(-3.8,2.28) 3(-3.8,-2.28)
  rect 7x5.7 smd: 2(1.75,0)
  silkscreen extent -3.91,3.58 -3.66,3.83, body extent -4.25,-3.4 5.25,3.4, height 2.4
Fiducial_2 [mm] "Fiducial Round 1mm"
  round 1 smd paste-0.5 mask+0.5: 0(0,0)
  Top Copper keep-out circle w0.2: c0,0 r0.9
Hole_3.2_Iso [mm]
  round 7 hole 3.2: Hole_3.2(0,0)
INF-PG-SOT23_N [mm] "SOT23, 3-Leads, Body 2.9x1.3mm, Pitch 0.95mm, IPC Medium Density"
  rect 1.05x0.6 smd: 1(-1.15,0.95) 2(-1.15,-0.95) 3(1.15,0)
  silkscreen extent -1.27,-1.5 0.7,1.92, body extent -0.7,-1.5 0.7,1.5, height 1.1
layermarker4 [mil] "Marker for a 4 layerstack"
  Top Copper lines w10: 50,0 100,0 ; 50,0 0,0 0,-50 50,-50 ; 50,0 50,-50 ; 100,0 150,0 ; 100,0 100,-50 ; 150,0 200,0 200,-50 150,-50 ; 150,0 150,-50 ; 50,-50 100,-50 ; 100,-50 150,-50
  Supply lines w10: 50,0 50,-50 ; 50,0 0,0 0,-50 50,-50 ; 50,0 100,0 ; 100,0 150,0 ; 100,0 100,-50 ; 150,0 150,-50 ; 150,0 200,0 200,-50 150,-50 ; 50,-50 100,-50 ; 100,-50 150,-50
  GND lines w10: 50,0 50,-50 ; 50,0 100,0 ; 50,0 0,0 0,-50 50,-50 ; 100,0 150,0 ; 100,0 100,-50 ; 150,0 150,-50 ; 150,0 200,0 200,-50 150,-50 ; 50,-50 100,-50 ; 100,-50 150,-50
  Bot Copper lines w10: 50,0 50,-50 ; 50,0 100,0 ; 50,0 0,0 0,-50 50,-50 ; 100,0 150,0 ; 100,0 100,-50 ; 150,0 150,-50 ; 150,0 200,0 200,-50 150,-50 ; 50,-50 100,-50 ; 100,-50 150,-50
MOLEX_47352_1001 [mm] "Molex SD Card Reader Push Push Type VDD Detect Switch"
  rect 0.8x1.5 smd: 1(7.54,-10.16) 2(6.44,-9.76) 3(5.34,-10.16) 4(4.24,-10.435) 5(3.14,-10.16) 6(2.04,-10.36) 7(0.94,-10.16) 8(-0.16,-10.16)
  rect 1x0.95 smd: 6_1(2.04,0.925)
  rect 1.4x1.9 smd: SH(-0.95,-12.3) SH(12.15,-13.5)
  rect 1.3x1.4 smd: SH(0.65,0.7) SH(6.35,0.7)
  silkscreen extent -1.4,-14.1 12.6,1.09, body extent -1.4,-14.2 12.7,1, height 1.9
MOLEX_MICROFIT_02x2_THT [mil] "Micro-Fit 3.0 Right Angle Header, 3.00mm Pitch, Dual Row, 4 Circuits, with Snap-in Plastic Peg PCB Lock, Tin, Glow Wire Capable, Black, 43045-0400"
  round 60 hole 40: 1(-59.02,-170) 2(59.02,-170) 3(-59.02,-287.99) 4(59.02,-287.99)
  round 39.37 hole 117.99 unplated paste+0 mask+4: ""(0,0)
  silkscreen extent -200,-209 200,85, body extent -200,-301 200,181, height 345
MOLEX_MICROFIT_03x2_THT [mil] "Micro-Fit 3.0 Right Angle Header, 3.00mm Pitch, Dual Row, 6 Circuits, with Snap-in Plastic Peg PCB Lock, Tin, Glow Wire Capable, Black, 43045-0600"
  round 60 hole 40: 1(-117.48,-170) 2(0,-170) 3(117.48,-170) 4(-117.48,-287.99) 5(0,-287.99) 6(117.48,-287.99)
  round 39.37 hole 117.99 unplated paste+0 mask+4: ""(0,0)
  silkscreen extent -256,-209 255,85, body extent -259,-301 259,181, height 345
MOLEX_MICROFIT_05x2_THT [mil] "Micro-Fit 3.0 Right Angle Header, 3.00mm Pitch, Dual Row, 10 Circuits, with Snap-in Plastic Peg PCB Lock, Tin, Glow Wire Capable, Black, 43045-1000"
  round 60 hole 40: 1(-235.98,-170) 2(-117.48,-170) 3(0,-170) 4(117.48,-170) 5(235.98,-170) 6(-235.98,-287.99) 7(-117.48,-287.99) 8(0,-287.99) 9(117.48,-287.99) 10(235.98,-287.99)
  round 39.37 hole 117.99 unplated paste+0 mask+4: ""(-151.5,0) ""(151.5,0)
  silkscreen extent -373,-209 373,85, body extent -377,-301 377,181, height 345
MOLEX_MICROFIT_06x2_THT [mil] "Micro-Fit 3.0 Right Angle Header, 3.00mm Pitch, Dual Row, 12 Circuits, with Snap-in Plastic Peg PCB Lock, Tin, Glow Wire Capable, Black, 43045-1200"
  round 60 hole 40: 1(-295,-170) 2(-177.01,-170) 3(-59.02,-170) 4(59.02,-170) 5(177.01,-170) 6(295,-170) 7(-295,-287.99) 8(-177.01,-287.99) 9(-59.02,-287.99) 10(59.02,-287.99) 11(177.01,-287.99) 12(295,-287.99)
  round 39.37 hole 117.99 unplated paste+0 mask+4: ""(-210.51,0) ""(210.51,0)
  silkscreen extent -433,-209 432,85, body extent -436,-301 436,181, height 345
MURA-BLM21-H1-CHIP-2_V [mm] "Chip Ferrite Bead, 2-Leads, Body 2x1.25mm, Height 1.05mm"
  rect 1.4x1 smd: 1(-1.3,0) 2(1.3,0)
  body extent -1,-0.63 1,0.63, height 1.05
NXP-SOIC-16_L [mm] "SOIC, 16-Leads, Body 10.5x7.6mm, Pitch 1.27mm, IPC High Density"
  oval 1.7x0.55 smd: 1(-4.65,4.445) 2(-4.65,3.175) 3(-4.65,1.905) 4(-4.65,0.635) 5(-4.65,-0.635) 6(-4.65,-1.905) 7(-4.65,-3.175) 8(-4.65,-4.445) 9(4.65,-4.445) 10(4.65,-3.175) 11(4.65,-1.905) 12(4.65,-0.635) 13(4.65,0.635) 14(4.65,1.905) 15(4.65,3.175) 16(4.65,4.445)
  silkscreen extent -4.77,-5.25 3.4,5.39, body extent -5.16,-5.25 5.16,5.25, height 2.65
NXP-SOT23-3_V [mm] "SOT23, 3-Leads, Body 1.3x2.9mm, Pitch 0.95mm"
  rect 0.6x0.7 smd paste-0.05: 1(0.95,1) 2(-0.95,1) 3(0,-1)
  silkscreen extent -1.45,-0.65 1.45,1.79, body extent -1.45,-0.65 1.45,0.65, height 1.1
NXP-SOT404_M [mm] "DPAK, 3-Leads, Body 10.3x9.8mm, Pitch 2.54mm, IPC Low Density"
  rect 4.45x1 smd: 1(-6.3,2.54) 3(-6.3,-2.54)
  rect 10.2x10.45 smd: 4(3.5,0)
  silkscreen extent -6.43,-5.15 -2,5.15, body extent -3.2,-5.15 6.6,5.15, height 4.5
ONSC-SOD-323-2-477-02_V [mm] "SOD, 2-Leads, Body 1.7x1.25mm"
  rect 0.63x0.83 smd: 1(-1.115,0) 2(1.115,0)
  silkscreen extent -1.24,-0.67 0.4,1.09, body extent -0.85,-0.63 0.85,0.63, height 1.06
Pinheader_2.54_2x4 [mm] "Pinheader, 2.54mm, gerade, 2-reihig"
  round 1.75 hole 1: 1(-3.81,-1.27) 2(-3.81,1.27) 3(-1.27,-1.27) 4(-1.27,1.27) 5(1.27,-1.27) 6(1.27,1.27) 7(3.81,-1.27) 8(3.81,1.27)
  silkscreen extent -5.01,-2.47 5.01,2.47, body extent -5.08,-2.54 5.08,2.54, height 8.74
Pinheader_2.54_2x12 [mm] "Pinheader, 2.54mm, gerade, 2-reihig"
  round 1.75 hole 1: 1(-13.97,-1.27) 2(-13.97,1.27) 3(-11.43,-1.27) 4(-11.43,1.27) 5(-8.89,-1.27) 6(-8.89,1.27) 7(-6.35,-1.27) 8(-6.35,1.27) 9(-3.81,-1.27) 10(-3.81,1.27) 11(-1.27,-1.27) 12(-1.27,1.27) 13(1.27,-1.27) 14(1.27,1.27) 15(3.81,-1.27) 16(3.81,1.27) 17(6.35,-1.27) 18(6.35,1.27) 19(8.89,-1.27) 20(8.89,1.27) 21(11.43,-1.27) 22(11.43,1.27) 23(13.97,-1.27) 24(13.97,1.27)
  silkscreen extent -15.1,-2.47 15.1,2.47, body extent -15.24,-2.54 15.24,2.54, height 8.74
PK0003A_L [mm] "SOT89, 3-Leads, Body 4.6x2.6mm, Pitch 1.5mm, IPC High Density"
  rrect17% 1.2x0.6 smd: 1(-1.7,1.5) 3(-1.7,-1.5)
  rrect20% 1.3x0.5 smd: 2(-1.65,0)
  Top Copper region: -1,0.25 -0.35,0.9 1.65,0.9 2.3,0.25 2.3,-0.25 1.65,-0.9 -0.35,-0.9 -1,-0.25 -1.2,-0.25 -1.2,0.25
  silkscreen extent -1.97,-2.3 1.4,2.47, body extent -2.19,-2.3 2.19,2.3, height 1.6
RESC1608X05N [mm] "Chip Resistor, 2-Leads, Body 1,60x0,80mm, IPC Medium Density"
  rrect50% 0.7x0.9 smd: 1(-0.7,0) 2(0.7,0)
  body extent -0.85,-0.45 0.85,0.45, height 0.45
Schurter_UMT_250 [mm] "Schurter UMT 250 Series Fuse"
  rect 2x3.75 smd: 1(-4.25,0) 2(4.25,0)
  silkscreen extent -2.5,-1.5 2.5,1.5, body extent -5.05,-1.5 5.05,1.5, height 3
SODFL250X110-2N [mm] "SODFL, 2-Leads, Body 1,25x2,50mm, IPC Medium Density, SOD323"
  rrect50% 0.85x0.45 smd: 1(-1.125,0) 2(1.125,0)
  silkscreen extent -1.45,-0.7 0.9,0.7, body extent -1.25,-0.67 1.25,0.67, height 1.1
SOIC127P600X175-8N [mm] "SOIC, 8-Leads, Body 4,90x3,90mm, Pitch 1,27mm, IPC Medium Density"
  rrect50% 1.5x0.6 smd: 1(-2.7,1.905) 2(-2.7,0.635) 3(-2.7,-0.635) 4(-2.7,-1.905) 5(2.7,-1.905) 6(2.7,-0.635) 7(2.7,0.635) 8(2.7,1.905)
  silkscreen extent -2.8,-2.45 1.55,2.8, body extent -3,-2.45 3,2.45, height 1.75
SOP254P610X218-4N [mm] "SOP, 4-Leads, Body 4,09x3,81mm, Pitch 2,54mm, IPC Medium Density"
  oval 1.4x0.55 smd: 1(-2.775,1.27) 2(-2.775,-1.27) 3(2.775,-1.27) 4(2.775,1.27)
  silkscreen extent -2.9,-2.15 1.68,2.22, body extent -3.05,-2.15 3.05,2.15, height 2.18
SOP254P680X220-6N [mm] "SOP, 6-Leads, Body 6,30x4,40mm, Pitch 2,54mm, IPC Medium Density"
  rect 1.65x0.6 smd: 1(-3.125,2.54) 2(-3.125,0) 3(-3.125,-2.54) 4(3.125,-2.54) 5(3.125,0) 6(3.125,2.54)
  silkscreen extent -3.25,-3.25 1.9,3.51, body extent -3.4,-3.25 3.4,3.25, height 2.2
SOT95P237X110-3N [mm] "SOT23, 3-Leads, Body 2,92x2,37mm, Pitch 0,95mm, IPC Medium Density"
  rect 1x0.6 smd: D(1.2,0) G(-1.2,0.95) S(-1.2,-0.95)
  silkscreen extent -0.3,-1.5 0.7,1.5, body extent -1.32,-1.52 1.32,1.52, height 1.1
Testpoint_S1 [mm] "Testpunkt, quardratisch 1mm"
  rrect20% 1x1 smd paste-0.5: 1(0,0)